# Altium PCB PCB1.PcbDoc
Units mm, origin at the board's own origin, x right, y up, seen from the top; angles counter-clockwise.
Board outline 113 x 67 mm, 2 copper layers (Top Layer, Bottom Layer); 67 components, 65 nets, 376 pads, 174 vias.
Unrouted connection lines stored in the file: 35.
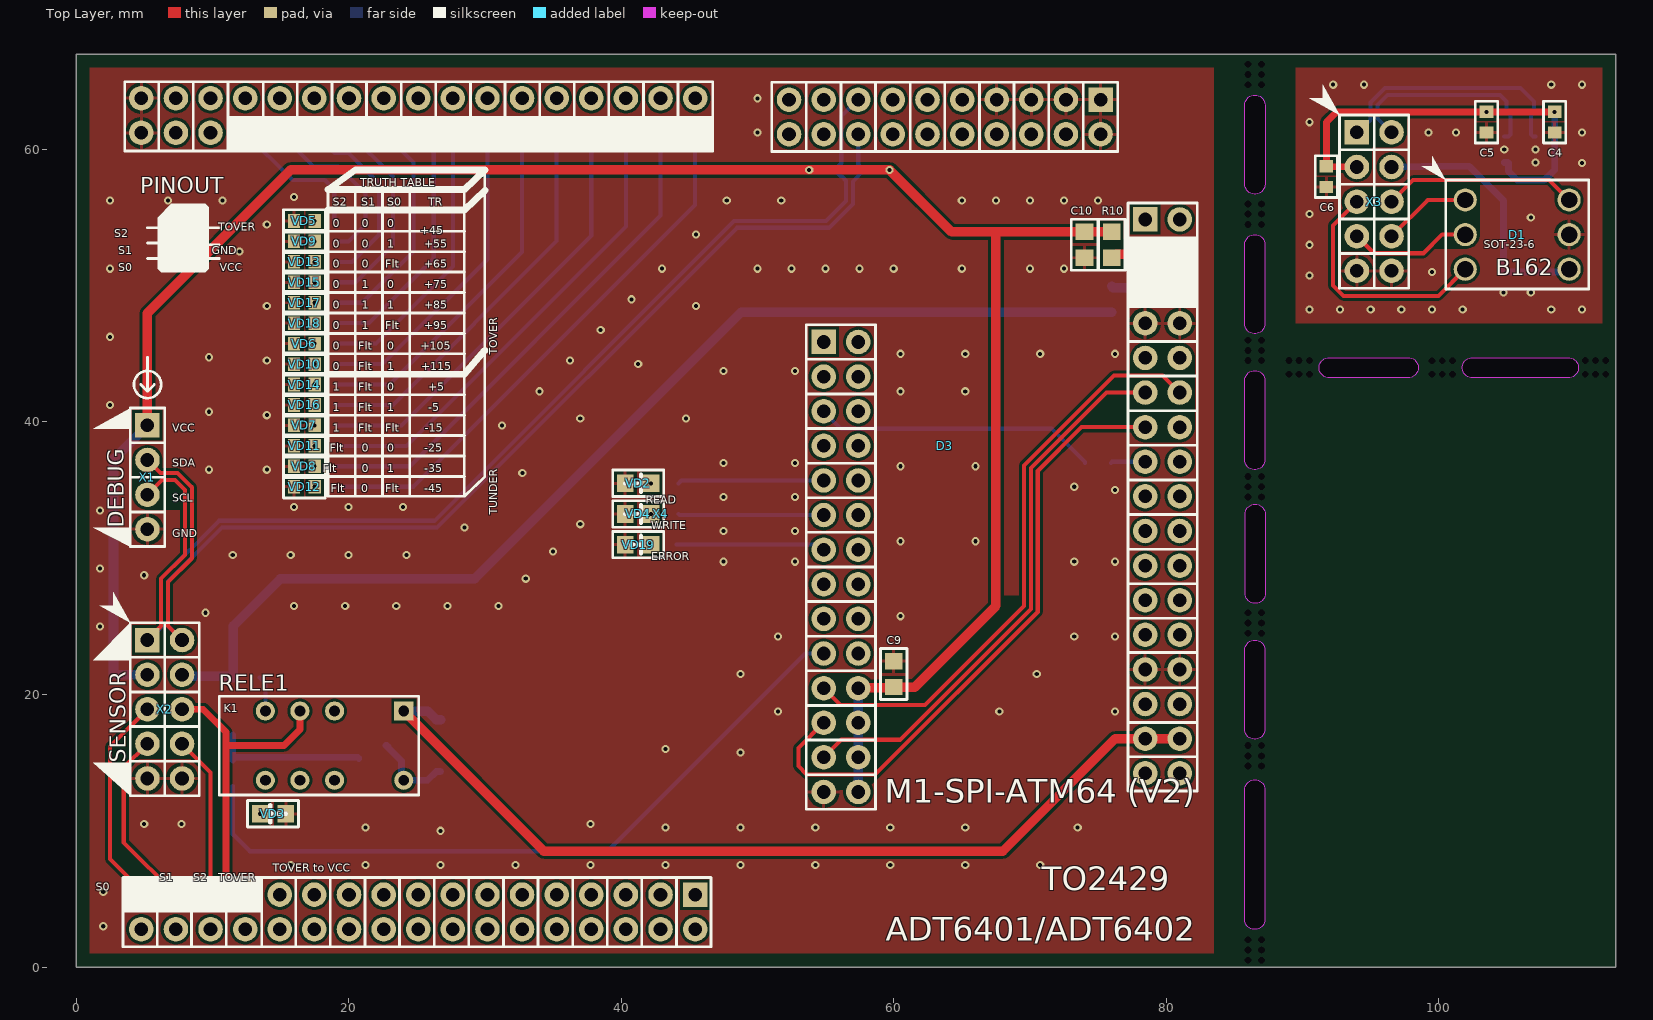
[diagram p0: Top Layer view]
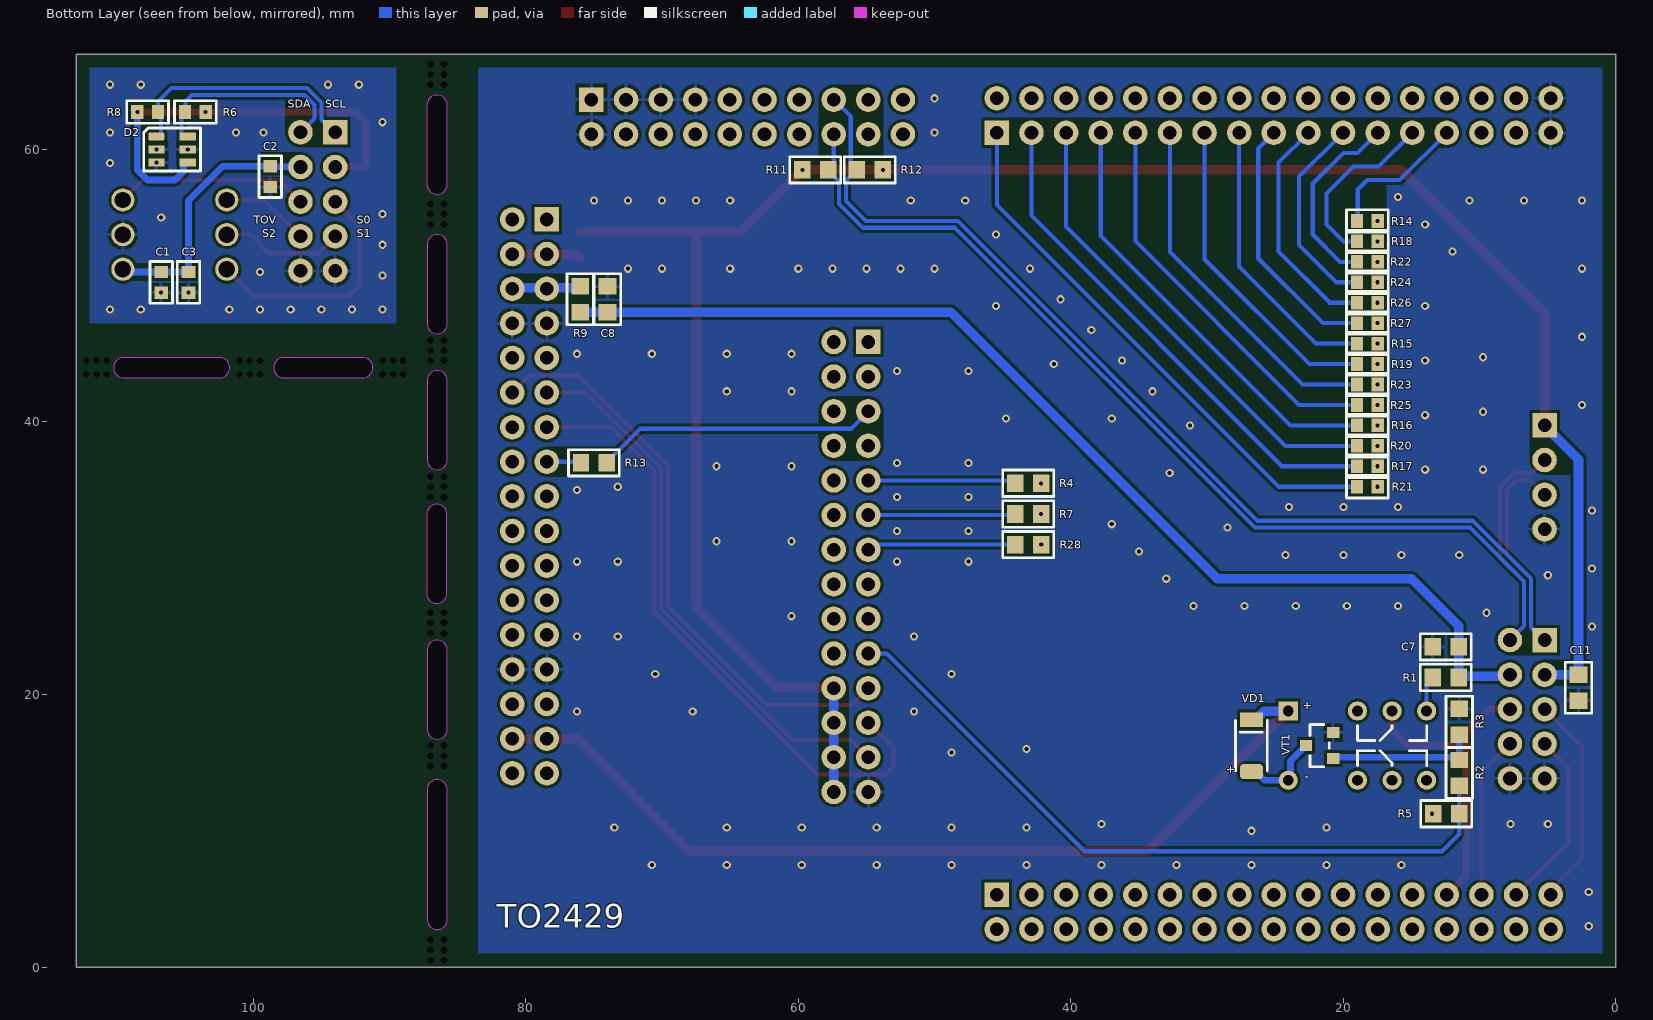
[diagram p1: Bottom Layer view, seen from below]

## Layer stack, top to bottom
Top Solder: solder mask 0.0102, Solder Resist, Dk 3.5
Top Layer: signal copper 0.0356
Dielectric 1: dielectric 0.32, FR-4, Dk 4.8
Bottom Layer: signal copper 0.0356
Bottom Solder: solder mask 0.0102, Solder Resist, Dk 3.5

## Board outline
0,0 113,0 113,67 0,67
cut-out: 87.242,3.5 cw(c86.5,3.5) 85.758,3.5 85.758,13 cw(c86.5,13) 87.242,13
cut-out: 102.459,43.247 cw(c102.459,43.989) 102.459,44.73 109.5,44.73 cw(c109.5,43.989) 109.5,43.247
cut-out: 91.959,43.247 cw(c91.959,43.989) 91.959,44.73 97.755,44.73 cw(c97.755,43.989) 97.755,43.247
cut-out: 87.242,17.462 cw(c86.5,17.462) 85.758,17.462 85.758,23.258 cw(c86.5,23.258) 87.242,23.258
cut-out: 87.266,27.43 cw(c86.524,27.43) 85.783,27.43 85.783,33.226 cw(c86.524,33.226) 87.266,33.226
cut-out: 87.242,37.238 cw(c86.5,37.238) 85.758,37.238 85.758,43.034 cw(c86.5,43.034) 87.242,43.034
cut-out: 87.242,47.212 cw(c86.5,47.212) 85.758,47.212 85.758,53.008 cw(c86.5,53.008) 87.242,53.008
cut-out: 87.25,57.454 cw(c86.508,57.454) 85.767,57.454 85.767,63.25 cw(c86.508,63.25) 87.25,63.25

## Design rules (kind name [scope] priority, off if disabled: settings)
Clearance [All] p1: gap=0.2 ignorepadtopadclearanceinfootprint=FALSE except(0: Arc-Hole Track-Hole SMDPad-Hole THPad-Hole Via-Hole Fill-Hole Poly-Hole Region-Hole Text-Hole)
ComponentClearance [All] p1: gap=0 collisioncheckmode=3 verticalgap=0 showdistances=FALSE
HoleToHoleClearance [All] p1: gap=0.2 allowstackedmicrovias=TRUE
MinimumSolderMaskSliver [All] p1: minsoldermaskwidth=0.1
PolygonConnect [All] p1: thpad.connectstyle=Relief thpad.reliefconductorwidth=0.254 thpad.reliefentries=4 thpad.polygonreliefangle="90 Angle" thpad.airgapwidth=0.254 smdpad.connectstyle=Relief smdpad.reliefconductorwidth=0.254 smdpad.reliefentries=4 smdpad.polygonreliefangle="90 Angle" smdpad.airgapwidth=0.254 via.connectstyle=Direct via.reliefconductorwidth=0.254 via.reliefentries=4 via.polygonreliefangle="90 Angle" via.airgapwidth=0.254
RoutingVias [All] p1: holewidth=0.3 width=0.6 viastyle="Through Hole" minholewidth=0.3 minwidth=0.6 maxholewidth=0.6 maxwidth=1.2
SilkToSilkClearance [All] p1: silktosilkclearance=0
SilkToSolderMaskClearance [IsPad] p1: minsilkscreentomaskgap=0 clearancetoexposedcopper=TRUE
SolderMaskExpansion [All] p1: expansion=0.102 istentingtop=FALSE
Width [All] p1: maxlimit=0.7 minlimit=0.3 preferedwidth=0.3
25 further rules are at their usual default settings.

## Classes and differential pairs
component class Main: C1 C2 C3 C4 C5 C6 C7 C8 C9 C10 C11 D1 D2 D3 K1 R1 R2 R3 R4 R5 R6 R7 R8 R9 R10 R11 R12 R13 R28 VD1 VD2 VD3 VD4 VD19 VT1 X1 X2 X3
component class FORMULA: R14 R15 R16 R17 R18 R19 R20 R21 R22 R23 R24 R25 R26 R27 VD5 VD6 VD7 VD8 VD9 VD10 VD11 VD12 VD13 VD14 VD15 VD16 VD17 VD18 X4

## Components (designator, comment, footprint, x,y, rotation, side; value= is the part's Value field where it differs from the comment)
C1 "0.1uF" 0603 106.75,50.25 r270 bottom
C2 "DNP" 0603 98.75,58 r270 bottom
C3 "DNP" 0603 104.75,50.25 r270 bottom
C4 "0.1uF" 0603 108.5,62 r270 top
C5 "DNP" 0603 103.5,62 r270 top
C6 "DNP" 0603 91.75,58 r270 top
C7 "0.1uF" 0805 12.5,23.5 r0 bottom
C8 "10uF" 0805 74,49 r90 bottom
C9 "0.1uF" 0805 60,21.5 r90 top
C10 "10uF" 0805 74,53 r270 top
C11 "0.1uF" 0805 2.75,20.5 r270 bottom
D1 "Temperature sensor ADT640X" "SOT-23-6 to DIP 7.62" 105.75,53.75 r0 top
D2 "I2C temperature sensor" SOT23-6 106,60 r270 bottom
D3 "M1-SPI-ATM64(V2)" M1-SPI-ATM64(V2) 63.75,38.25 r270 top locked
K1 "V23079A1001B301 TE" V23079A1001B301 17.75,16.25 r180 top locked
R1 "10k" 0805 12.5,21.25 r180 bottom
R2 "4.7k" 0805 11.5,14.25 r90 bottom
R3 "20k" 0805 11.5,18 r90 bottom
R4 "2.2k" 0805 43.12,35.5 r180 bottom
R5 "2.2k" 0805 12.45,11.25 r0 bottom
R6 "10k" 0603 104.25,62.75 r180 bottom
R7 "2.2k" 0805 43.12,33.25 r180 bottom
R8 "10k" 0603 107.75,62.75 r0 bottom
R9 "1" 0805 76,49 r90 bottom
R10 "1" 0805 76,53 r270 top
R11 "10k" 0805 58.75,58.5 r0 bottom
R12 "10k" 0805 54.75,58.5 r180 bottom
R13 "100" 0805 75,37 r0 bottom
R14 "1k" 0603 18.25,54.75 r180 bottom
R15 "1k" 0603 18.25,45.75 r180 bottom
R16 "1k" 0603 18.25,39.75 r180 bottom
R17 "1k" 0603 18.25,36.75 r180 bottom
R18 "1k" 0603 18.25,53.25 r180 bottom
R19 "1k" 0603 18.25,44.25 r180 bottom
R20 "1k" 0603 18.25,38.25 r180 bottom
R21 "1k" 0603 18.25,35.25 r180 bottom
R22 "1k" 0603 18.25,51.75 r180 bottom
R23 "1k" 0603 18.25,42.75 r180 bottom
R24 "1k" 0603 18.25,50.25 r180 bottom
R25 "1k" 0603 18.25,41.25 r180 bottom
R26 "1k" 0603 18.25,48.75 r180 bottom
R27 "1k" 0603 18.25,47.25 r180 bottom
R28 "2.2k" 0805 43.12,31 r180 bottom
VD1 "LL4148 NXP" SOD80C 26.75,16.25 r90 bottom
VD2 "LED(0805)" 0805(LED) 41.25,35.5 r180 top
VD3 "LED(0805)" 0805(LED) 14.45,11.25 r0 top
VD4 "LED(0805)" 0805(LED) 41.25,33.25 r180 top
VD5 "LED(0603)" 0603(LED) 16.75,54.75 r180 top
VD6 "LED(0603)" 0603(LED) 16.75,45.749 r180 top
VD7 "LED(0603)" 0603(LED) 16.75,39.749 r180 top
VD8 "LED(0603)" 0603(LED) 16.75,36.749 r180 top
VD9 "LED(0603)" 0603(LED) 16.75,53.25 r180 top
VD10 "LED(0603)" 0603(LED) 16.75,44.25 r180 top
VD11 "LED(0603)" 0603(LED) 16.75,38.249 r180 top
VD12 "LED(0603)" 0603(LED) 16.75,35.249 r180 top
VD13 "LED(0603)" 0603(LED) 16.75,51.75 r180 top
VD14 "LED(0603)" 0603(LED) 16.75,42.75 r180 top
VD15 "LED(0603)" 0603(LED) 16.75,50.25 r180 top
VD16 "LED(0603)" 0603(LED) 16.75,41.25 r180 top
VD17 "LED(0603)" 0603(LED) 16.75,48.75 r180 top
VD18 "LED(0603)" 0603(LED) 16.75,47.25 r180 top
VD19 "LED(0805)" 0805(LED) 41.25,31 r180 top
VT1 "MMBT5551L" SOT-23 21.75,16.25 r90 bottom
X1 "PLS4-2,54" PLS4-2,54 5.25,39.75 r270 top
X2 "PLD10-2,54" PLD10-2,54 5.25,24 r270 top
X3 "PLD10-2,54" PLD10-2,54 94,61.25 r270 top
X4 "FORMULA" FORMULA 33.25,32 r0 top locked

## Footprints (in the part's own frame and the unit in brackets; to place one, negate y for a bottom-side part, rotate by r counter-clockwise, add the part's x,y. Pads: shape width x height; smd on the part's side, far side on the other; paste and mask are expansions set on the pad)
0603 [mm]
  rect 0.9x1 smd: 1(-0.76,0) 2(0.76,0)
  silkscreen extent -1.53,-0.82 1.53,0.82, body extent -0.8,-0.4 0.8,0.4, height 0.45
0603(LED) [mm]
  rect 0.9x1 smd: 1(-0.76,0) 2(0.76,0)
  silkscreen extent -1.53,-0.82 1.53,0.82, body extent -0.82,-0.33 0.82,0.4, height 0.68
0805 [mm]
  rect 1.2x1.3 smd: 1(-0.95,0) 2(0.95,0)
  silkscreen extent -1.87,-0.97 1.87,0.97, body extent -1.05,-0.63 0.95,0.63, height 0.55
0805(LED) [mm]
  rect 1.2x1.3 smd: 1(-0.95,0) 2(0.95,0)
  silkscreen extent -1.87,-0.97 1.87,0.97, body extent -1.03,-0.41 1.03,0.5, height 0.85
FORMULA [mm]
  rect 1.8x1.8 hole 1: 1(12.18,29.22) VDDF(12.18,-26.68) VEEF(45.2,22.86)
  round 1.8 hole 1: 2(9.64,29.22) 3(7.1,29.22) 4(4.56,29.22) 5(2.02,29.22) 6(-0.52,29.22) 7(-3.06,29.22) 8(-5.6,29.22) 9(-8.14,29.22) 10(-10.68,29.22) 11(-13.22,29.22) 12(-15.76,29.22) 13(-18.3,29.22) 14(-20.84,29.22) 15(-23.38,29.22) 16(-25.92,29.22) 17(12.18,31.76) 18(9.64,31.76) 19(7.1,31.76) 20(4.56,31.76) 21(2.02,31.76) 22(-0.52,31.76) 23(-3.06,31.76) 24(-5.6,31.76) 25(-8.14,31.76) 26(-10.68,31.76) 27(-13.22,31.76) 28(-15.76,31.76) 29(-18.3,31.76) 30(-20.84,31.76) 31(-23.38,31.76) 32(-25.92,31.76) 33(-28.46,-29.22) 34(-25.92,-29.22) 35(-23.38,-29.22) 36(-20.84,-29.22) 37(-18.3,-29.22) 38(-15.76,-29.22) 39(-13.22,-29.22) 40(-10.68,-29.22) 41(-8.14,-29.22) 42(-5.6,-29.22) 43(-3.06,-29.22) 44(-0.52,-29.22) 45(2.02,-29.22) 46(4.56,-29.22) 47(7.1,-29.22) 48(9.64,-29.22) 49(-28.46,-26.68) 50(-25.92,-26.68) 51(-23.38,-26.68) 52(-20.84,-26.68) 53(-18.3,-26.68) 54(-15.76,-26.68) 55(-13.22,-26.68) 56(-10.68,-26.68) 57(-8.14,-26.68) 58(-5.6,-26.68) 59(-3.06,-26.68) 60(-0.52,-26.68) 61(2.02,-26.68) 62(4.56,-26.68) 63(7.1,-26.68) 64(9.64,-26.68) +5V(45.2,-15.24) +5V(47.74,-15.24) +5V_VCCF(45.2,20.32) +5V_VCCS(47.74,20.32) +5V_VDDF(45.2,17.78) +5V_VDDS(47.74,17.78) +12V(45.2,-12.7) +12V(47.74,-12.7) -12V(45.2,-17.78) -12V(47.74,-17.78) GND(-28.46,29.22) GND(-28.46,31.76) GND(45.2,-10.16) GND(45.2,15.24) GND(47.74,-10.16) GND(47.74,15.24) IN-OUT1(47.74,10.16) IN-OUT2(47.74,7.62) IN-OUT3(47.74,5.08) IN-OUT4(47.74,2.54) IN-OUT5(47.74,0) IN-OUT6(47.74,-2.54) IN-OUT7(47.74,-5.08) IN-OUT8(47.74,-7.62) NC(45.2,12.7) NC(47.74,12.7) OUT1(45.2,10.16) OUT2(45.2,7.62) OUT3(45.2,5.08) OUT4(45.2,2.54) OUT5(45.2,0) OUT6(45.2,-2.54) OUT7(45.2,-5.08) OUT8(45.2,-7.62) VDDS(12.18,-29.22) VEES(47.74,22.86)
  silkscreen extent -29.8,-30.51 49.02,32.97, body extent -29.79,-30.4 48.98,32.92, height 3
M1-SPI-ATM64(V2) [mm]
  rect 1.8x1.8 hole 1: 1X2(-25.4,11.43) 1X3(-7.62,-8.89)
  round 1.8 hole 1: 2X2(-22.86,11.43) 2X3(-7.62,-6.35) 3X2(-25.4,8.89) 3X3(-5.08,-8.89) 4X2(-22.86,8.89) 4X3(-5.08,-6.35) 5X2(-25.4,6.35) 5X3(-2.54,-8.89) 6X2(-22.86,6.35) 6X3(-2.54,-6.35) 7X2(-25.4,3.81) 7X3(0,-8.89) 8X2(-22.86,3.81) 8X3(0,-6.35) 9X2(-25.4,1.27) 9X3(2.54,-8.89) 10X2(-22.86,1.27) 10X3(2.54,-6.35) 11X2(-25.4,-1.27) 11X3(5.08,-8.89) 12X2(-22.86,-1.27) 12X3(5.08,-6.35) 13X2(-25.4,-3.81) 13X3(7.62,-8.89) 14X2(-22.86,-3.81) 14X3(7.62,-6.35) 15X2(-25.4,-6.35) 15X3(10.16,-8.89) 16X2(-22.86,-6.35) 16X3(10.16,-6.35) 17X2(-25.4,-8.89) 17X3(12.7,-8.89) 18X2(-22.86,-8.89) 18X3(12.7,-6.35) 19X2(-25.4,-11.43) 19X3(15.24,-8.89) 20X2(-22.86,-11.43) 20X3(15.24,-6.35) 21X3(17.78,-8.89) 22X3(17.78,-6.35) 23X3(20.32,-8.89) 24X3(20.32,-6.35) 25X3(22.86,-8.89) 26X3(22.86,-6.35) 27X3(25.4,-8.89) 28X3(25.4,-6.35)
  silkscreen extent -26.67,-12.7 26.67,12.7
PLD10-2,54 [mm]
  rect 1.8x1.8 hole 1: 1(0,-0.01)
  round 1.8 hole 1: 2(0,2.53) 3(2.54,-0.01) 4(2.54,2.53) 5(5.08,-0.01) 6(5.08,2.53) 7(7.62,-0.01) 8(7.62,2.53) 9(10.16,-0.01) 10(10.16,2.53)
  silkscreen extent -1.27,-1.28 11.43,3.8, body extent -1.27,-1.28 11.43,3.8, height 8.54
PLS4-2,54 [mm]
  rect 1.8x1.8 hole 1: 1(0,-0.01)
  round 1.8 hole 1: 2(2.54,-0.01) 3(5.08,-0.01) 4(7.62,-0.01)
  silkscreen extent -1.27,-1.28 8.89,1.26, body extent -1.27,-1.28 8.89,1.26, height 9.2
SOD80C [mm]
  rrect50% 1.1x1.7 smd: 1(-1.9,0)
  rect 1.1x1.7 smd: 2(1.9,0)
  silkscreen extent -1.85,-1.17 1.85,1.17, body extent -1.9,-0.8 1.8,0.8, height 1.55
SOT23-6 [mm]
  rrect50% 0.6x1.2 smd: 1(-0.95,-1.1)
  rect 0.6x1.2 smd: 2(0,-1.1) 3(0.95,-1.1) 4(0.95,1.2) 5(0,1.2) 6(-0.95,1.2)
  silkscreen extent -1.57,-2.03 1.58,2.13
SOT-23 [mm]
  rect 0.8x0.9 smd: 1(-0.95,-1) 1(-0.95,-1) 2(0.95,-1) 2(0.95,-1) 3(0,1) 3(0,1)
  silkscreen extent -1.55,-0.72 1.55,0.7, body extent -1.5,-1.25 1.5,1.25, height 1.05
"SOT-23-6 to DIP 7.62" [mm]
  round 1.7 hole 1.2: 1(-3.81,2.54) 2(-3.81,0) 3(-3.81,-2.54) 4(3.81,-2.54) 5(3.81,0) 6(3.81,2.54)
  silkscreen extent -7,-4 5.25,5.75, body extent -5.05,-3.81 5.05,3.81, height 3.05
V23079A1001B301 [mm]
  rect 1.4x1.4 hole 0.8: 1(-6.3,-2.54)
  round 1.4 hole 0.8: 3(-1.22,-2.54) 4(1.32,-2.54) 5(3.86,-2.54) 8(3.86,2.54) 9(1.32,2.54) 10(-1.22,2.54) 12(-6.3,2.54)
  silkscreen extent -7.4,-3.63 7.25,3.63, body extent -7.25,-3.6 7.25,3.6, height 9.4

## Part data
C1 C2 C3 C4 C5 C6: library part C0603, ComponentHeigt=1.3, Firme=AVX, KIND=Конденсатор, Leadform=SMD, Packaging=0805
C7 C8 C9 C10 C11: library part C0805, ComponentHeigt=1.3, Firme=AVX, KIND=Конденсатор, Leadform=SMD, Packaging=0805
D1: library part ADT6402
D2: library part TMP100
R1 R2 R3 R4 R5 R7 R9 R10 R11 R12 R13 R28: library part "R0805 Yageo", ComponentHeigt=0.6, Firme=Yageo, KIND=Резистор, Leadform=SMD, Packaging=0805
R6 R8 R14 R15 R16 R17 R18 R19 R20 R21 R22 R23 R24 R25 R26 R27: library part "R0603 Yageo", ComponentHeigt=0.5, Firme=Yageo, KIND=Резистор, Leadform=SMD, Packaging=0402
D3 X1 X2 X3: ComponentHeigt=5.5, Name=Вилка, Specification="Вилка PLD2-2 *", Typ=PLD2-2
VD1: Component Link=http://www.nxp.com, ComponentHeigt=1.6, Firme=NXP, KIND="Диод LL4148 NXP", Leadform=SMD, NN=24009301, Packaging=SOD-80C
VD2 VD3 VD4 VD5 VD6 VD7 VD8 VD9 VD10 VD11 VD12 VD13 VD14 VD15 VD16 VD17 VD18 VD19: ComponentHeigt=0.75, Firme=Kingbright, KIND="Светодиод L-1154GD Kingbright", Leadform="в отверстия", NN=24003000
VT1: ComponentHeigt=1.1, Firme=ONS, KIND="Транзистор MMBT5551L*G ONS", Leadform=SMD, NN=24007468, Packaging=SOT-23

## Free pads (board coordinates)
  round 0 hole 0.5 unplated: 38(87,1.25) 38(87,15.5) 38(87,25.25) 38(87,35.25) 38(87,45.25) 38(87,55.25) 38(87,65.5) 38(89.75,43.5) 38(100.255,43.497) 38(111.5,43.5) 39(87,2) 39(87,16.25) 39(87,26) 39(87,36) 39(87,46) 39(87,56) 39(87,66.25) 39(90.5,43.5) 39(101.005,43.497) 39(112.25,43.5) 41(86,15.5) 41(86,0.5) 41(86,1.25) 41(86,14.75) 41(86,24.5) 41(86,25.25) 41(86,34.5) 41(86,35.25) 41(86,44.5) 41(86,45.25) 41(86,54.5) 41(86,55.25) 41(86,64.75) 41(86,65.5) 41(89,44.5) 41(89.75,44.5) 41(99.505,44.497) 41(100.255,44.497) 41(110.75,44.5) 41(111.5,44.5) 42(86,2) 42(86,16.25) 42(86,26) 42(86,36) 42(86,46) 42(86,56) 42(86,66.25) 42(90.5,44.5) 42(101.005,44.497) 42(112.25,44.5) 43(87,0.5) 43(87,14.75) 43(87,24.5) 43(87,34.5) 43(87,44.5) 43(87,54.5) 43(87,64.75) 43(89,43.5) 43(99.505,43.497) 43(110.75,43.5)

## Via types
v1: diameter 0.6, hole 0.3, Top Layer to Bottom Layer, tented both sides, 174 vias

## Nets (pads, with @x,y where several pads share a name; then routed paths per layer and width w, separated by ;. In a path a pad name is that pad's centre, name@x,y a point inside that pad or via, vN(x,y) a via of type N, cw(c..) or ccw(c..) an arc to the next point about the centre after c; other vN are vias at no path point)
1: R14.1 X4.14 | length 10.6
  Bottom Layer w0.3: X4.14 15.88,57.75 18.25,57.75 18.947,57.053 18.947,54.813 R14.1
2: R18.1 X4.13 | length 13.2
  Bottom Layer w0.3: X4.13 17.42,58.75 19.25,58.75 21.25,56.75 21.25,54.5 20,53.25 R18.1
3: R22.1 X4.12 | length 14.1
  Bottom Layer w0.3: X4.12 18.96,59.75 20,59.75 22.25,57.5 22.25,53.75 20.25,51.75 R22.1
4: R24.1 X4.11 | length 14.9
  Bottom Layer w0.3: R24.1 20.5,50.25 23.25,53 23.25,58 X4.11
5: R26.1 X4.10 | length 16.9
  Bottom Layer w0.3: R26.1 21,48.75 24.75,52.5 24.75,59.04 X4.10
6: R27.1 X4.9 | length 18.9
  Bottom Layer w0.3: R27.1 21.5,47.25 26.25,52 26.25,60.08 X4.9
7: R15.1 X4.8 | length 20.8
  Bottom Layer w0.3: R15.1 22,45.75 27.65,51.4 X4.8
8: R19.1 X4.7 | length 23.6
  Bottom Layer w0.3: R19.1 22.5,44.25 30.19,51.94 X4.7
9: R23.1 X4.6 | length 26.5
  Bottom Layer w0.3: R23.1 23,42.75 32.73,52.48 X4.6
10: R25.1 X4.5 | length 29.2
  Bottom Layer w0.3: R25.1 23.25,41.25 35.27,53.27 X4.5
11: R16.1 X4.4 | length 32.1
  Bottom Layer w0.3: R16.1 23.879,39.75 37.81,53.681 X4.4
12: R20.1 X4.3 | length 34.9
  Bottom Layer w0.3: R20.1 24.25,38.25 40.35,54.35 X4.3
13: R17.1 X4.2 | length 37.6
  Bottom Layer w0.3: R17.1 24.5,36.75 42.89,55.14 X4.2
14: R21.1 X4.1 | length 40.3
  Bottom Layer w0.3: R21.1 24.75,35.25 45.43,55.93 X4.1
+5V: K1.1 VD1.2 X4.+5V | length 67.6
  Top Layer w0.7: K1.1 34.34,8.5 68,8.5 76.26,16.76 78.45,16.76 X4.+5V@80.99,16.76
  Bottom Layer w0.7: K1.1 25.81,18.79 26.45,18.15 VD1.2
DI1_MC: D3.21X3 X4.IN-OUT1 | length 43.2
  Top Layer w0.3: D3.21X3 56.11,19.22 62.306,19.22 69.571,26.485 69.571,36.821 76.16,43.41 79.74,43.41 X4.IN-OUT1
DO1_MC: D3.25X3 X4.OUT1 | length 40.7
  Top Layer w0.3: D3.25X3 56.15,16.68 60.473,16.68 70.071,26.278 70.071,36.614 75.617,42.16 X4.OUT1
DO2_MC: D3.23X3 X4.OUT2 | length 46.3
  Top Layer w0.3: D3.23X3 53,16.07 53,14.75 53.61,14.14 58.64,14.14 70.571,26.071 70.571,36.407 73.784,39.62 X4.OUT2
GND: C7.2 C8.2 C9.2 C10.2 C11.2 D3.1X2 D3.2X2 D3.3X2 D3.5X2 D3.7X2 D3.27X3 R3.2 VD2.2 VD3.2 VD4.2 VD5.2 VD6.2 VD7.2 VD8.2 VD9.2 VD10.2 VD11.2 VD12.2 VD13.2 VD14.2 VD15.2 VD16.2 VD17.2 VD18.2 VD19.2 VT1.2 X1.4 X2.9 X2.10 X4.GND
  other v1: 2,3 2,5.5 15.75,7.5 21.25,7.5 26.75,7.5 32.25,7.5 37.75,7.5 43.25,7.5 48.75,7.5 54.25,7.5 59.75,7.5 65.25,7.5 70.75,7.5 26.75,10 21.25,10.25 43.25,10.25 48.75,10.25 54.25,10.25 59.75,10.25 65.25,10.25 73.5,10.25 5,10.5 7.75,10.5 37.75,10.5 48.75,15.75 43.25,16 51.5,18.75 67.75,18.75 76.25,18.75 48.75,21.5 70.5,21.5 51.5,24.25 73.25,24.25 76.25,24.25 1.75,25 60.5,25.75 9.5,26 16,26.5 19.75,26.5 23.5,26.5 27.25,26.5 31,26.5 33,28.5 5,28.75 1.75,29.25 47.5,29.75 52.75,29.75 73.25,29.75 76.25,29.75 11.5,30.25 15.75,30.25 20,30.25 24.25,30.25 35,30.5 60.5,31.25 66,31.25 47.5,32 52.75,32 28.5,32.25 37,32.5 1.75,33.5 16,33.75 20,33.75 24,33.75 47.5,34.5 52.75,34.5 76.25,35 73.25,35.25 32.75,36.25 9.75,36.5 14,36.5 60.5,36.75 66,36.75 47.5,37 52.75,37 31.25,39.75 37,40.25 44.75,40.25 14,40.5 9.75,40.75 2.5,41.25 34,42.25 60.5,42.25 65.25,42.25 47.5,43.75 52.75,43.75 41.25,44.25 14,44.5 36.25,44.5 9.75,44.75 60.5,45 65.25,45 70.75,45 76.25,45 2.5,46.25 38.5,46.75 14,48.5 45.5,48.5 40.75,49 2.5,51.25 43,51.25 50,51.25 52.5,51.25 55,51.25 57.5,51.25 60,51.25 65,51.25 70,51.25 72.5,51.25 12,52.5 45.5,53.75 14,54.5 2.5,56.25 6.75,56.25 10.75,56.25 47.75,56.25 51.75,56.25 65,56.25 67.5,56.25 70,56.25 72.5,56.25 75,56.25 16,56.5 50,61.25 50,63.75
GND_KY: C1.2 C2.2 C3.2 C4.2 C5.2 C6.2 D1.5 D2.2 D2.3 D2.5 X3.9 X3.10
  other v1: 90.5,48.25 92.75,48.25 95,48.25 97.25,48.25 99.5,48.25 101.75,48.25 108.25,48.25 110.5,48.25 104.75,49.49 106.75,49.49 90.5,50.75 99.5,51 90.5,53 106.75,55 90.5,55.25 110.5,59 107.1,59.05 104.8,60 107.1,60 99.25,61.25 101.25,61.25 110.5,61.25 90.5,62 92.25,64.75 94.5,64.75 108.25,64.75 110.5,64.75
IN1: K1.4 X2.6 X4.52 | length 23.7
  Top Layer w0.5: X2.6 9.33,18.92 11,17.25 11,16.25 ; X4.52 11,6.73 11,16.25 ; K1.4 16.43,17.43 15.25,16.25 11,16.25
LED_ERROR: D3.13X3 R28.1 | length 11.2
  Bottom Layer w0.3: R28.1 54.86,31 D3.13X3
LED_READ: D3.9X3 R4.1 | length 10.7
  Bottom Layer w0.3: R4.1@44.2,35.5 44.41,35.71 D3.9X3
LED_WRITE: D3.11X3 R7.1 | length 10.7
  Bottom Layer w0.3: R7.1@44.2,33.25 44.28,33.17 D3.11X3
NetK1_5: K1.5 R1.1 | length 2.6
  Bottom Layer w0.3: R1.1 13.89,20.81 K1.5
NetK1_12: K1.12 VD1.1 VT1.3 | length 6.1
  Bottom Layer w0.5: VT1.3@22.75,16.25 22.8,16.25 22.95,16.1 22.95,16.05 23.878,15.122 23.878,13.882 K1.12 25.796,13.71 26.436,14.35 VD1.1
NetR2_2: R2.2 R3.1 VT1.1 | length 11.2
  Bottom Layer w0.5: R3.1 11.5,15.399 R2.2 11.699,15.399 20.651,15.399 VT1.1@20.75,15.3
NetR4_2: R4.2 VD2.1
  other v1: 42.2,35.5
NetR5_2: R5.2 VD3.1
  other v1: 13.5,11.25
NetR7_2: R7.2 VD4.1
  other v1: 42.2,33.25
NetR14_2: R14.2 VD5.1
  other v1: 17.5,54.75
NetR15_2: R15.2 VD6.1
  other v1: 17.5,45.75
NetR16_2: R16.2 VD7.1
  other v1: 17.5,39.75
NetR17_2: R17.2 VD8.1
  other v1: 17.5,36.75
NetR18_2: R18.2 VD9.1
  other v1: 17.5,53.25
NetR19_2: R19.2 VD10.1
  other v1: 17.5,44.25
NetR20_2: R20.2 VD11.1
  other v1: 17.5,38.25
NetR21_2: R21.2 VD12.1
  other v1: 17.5,35.25
NetR22_2: R22.2 VD13.1
  other v1: 17.5,51.75
NetR23_2: R23.2 VD14.1
  other v1: 17.5,42.75
NetR24_2: R24.2 VD15.1
  other v1: 17.5,50.25
NetR25_2: R25.2 VD16.1
  other v1: 17.5,41.25
NetR26_2: R26.2 VD17.1
  other v1: 17.5,48.75
NetR27_2: R27.2 VD18.1
  other v1: 17.5,47.25
NetR28_2: R28.2 VD19.1
  other v1: 42.17,31
OUT1: X2.5 X4.49 | length 15.7
  Top Layer w0.3: X4.49 4.79,5.629 2.5,7.919 2.5,16.18 X2.5
OUT2: X2.7 X4.50 | length 13.4
  Top Layer w0.3: X2.7 3.5,14.64 3.5,9.15 X4.50
OUT3: X2.8 X4.51 | length 11.9
  Top Layer w0.3: X2.8 9.87,14.29 X4.51
RELE1: D3.19X3 R2.1 R5.1 | length 53.4
  Bottom Layer w0.3: R2.1 R5.1 11.5,9.75 12.75,8.5 39,8.5 53.51,23.01 D3.19X3
RST_IN: R13.2 X4.OUT3 | length 2.5
  Bottom Layer w0.3: R13.2 76.03,37.08 X4.OUT3
RST_MC: D3.5X3 R13.1 | length 20.8
  Bottom Layer w0.3: D3.5X3 56.15,39.5 71.6,39.5 74.05,37.05 R13.1
S0: D1.3 X3.5 | length 17.7
  Top Layer w0.3: X3.5 92.25,54.43 92.25,50 93,49.25 99.98,49.25 D1.3
S1: D1.2 X3.7 | length 9
  Top Layer w0.3: X3.7 95.24,52.38 98.88,52.38 100.25,53.75 D1.2
S2: D1.1 X3.8 | length 6.5
  Top Layer w0.3: X3.8 99.19,56.29 D1.1
SCL_TMP100: D2.1 R8.1 X3.1 | length 18.4
  Bottom Layer w0.3: X3.1 94.74,62 94.824,62 95,62.176 95,63.457 96.043,64.5 106,64.5 106.976,63.524 106.976,62.764 R8.1 106.75,62.51 106.75,61.1 106.9,60.95 D2.1
SCL_W: D3.15X2 R12.1 X1.3 X2.1 | length 90.9
  Top Layer w0.3: X2.1 6.25,25.01 6.25,28.5 8,30.25 8,35 7.25,35.75 6.321,35.75 X1.3
  Bottom Layer w0.3: X2.1 5.99,24.75 6.074,24.75 6.25,24.926 6.25,28.5 10.5,32.75 26.293,32.75 48.293,54.75 55.043,54.75 56.5,56.207 56.5,57.7 56.2,58 56.15,58 55.7,58.45 R12.1 56.15,58.95 56.15,62.4 D3.15X2
SDA_TMP100: D2.6 R6.1 X3.2 | length 15.5
  Bottom Layer w0.3: X3.2 95.5,62.28 95.5,63.25 96.25,64 104.5,64 104.976,63.524 104.976,62.784 105.25,62.51 105.25,61.1 105.1,60.95 D2.6
SDA_W: D3.16X2 R11.1 X1.2 X2.2 | length 88.5
  Top Layer w0.3: X1.2 6.2,36.25 7.457,36.25 8.5,35.207 8.5,30 6.75,28.25 6.75,25.03 X2.2
  Bottom Layer w0.3: X2.2 6.75,25.03 6.75,28.293 10.707,32.25 26.5,32.25 48.5,54.25 55.25,54.25 57,56 57,57.65 57.8,58.45 R11.1 57.4,58.9 D3.16X2
TOVER: D1.6 X3.6 | length 14.3
  Top Layer w0.3: X3.6 98.11,57.75 108.1,57.75 D1.6
VCC: R10.2 X4.+5V_VCCF X4.+5V_VCCS | length 5.1
  Top Layer w0.7: R10.2 76.05,52.05 76.32,52.32 X4.+5V_VCCF X4.+5V_VCCS
VCC_KY: C4.1 C5.1 C6.1 D2.4 R6.2 R8.2 X3.3 | length 31.7
  Top Layer w0.5: X3.3 93.965,58.735 91.775,58.735 C6.1 91.75,62 92.5,62.75 103.49,62.75 C4.1@108.51,62.75 ; v1(103.51,62.75) C5.1@103.52,62.76
  Bottom Layer w0.5: D2.4 105.055,59.05 105.105,59 105.105,58.395 105.75,57.75 107.75,57.75 108.51,58.51 R8.2@108.51,62.7
  other v1: 108.49,62.75
VCC_W: C9.1 C10.1 C11.1 D3.22X3 D3.24X3 D3.26X3 D3.28X3 R10.1 R11.2 R12.2 X1.1 X2.3 | length 154.7
  Top Layer w0.7: X1.1 5.24,47.99 15.75,58.5 v1(53.8,58.5) v1(59.7,58.5) 64.25,53.95 67.5,53.95 ; D3.22X3@57.41,20.46 D3.22X3 57.44,20.51 59.96,20.51 C9.1 61.55,20.55 67.5,26.5 67.5,53.95 ; R10.1 C10.1 67.5,53.95
  Bottom Layer w0.7: X2.3 5.235,21.455 2.755,21.455 C11.1 2.75,37.26 X1.1 ; D3.28X3 D3.26X3 D3.24X3 D3.22X3
VDD: R9.2 X4.+5V_VDDF X4.+5V_VDDS | length 5.1
  Bottom Layer w0.7: R9.2 76.085,49.865 80.905,49.865 X4.+5V_VDDS
VDD_ADT640X: C1.1 C2.1 C3.1 D1.4 X3.4 | length 19.4
  Bottom Layer w0.5: X3.4 96.555,58.735 98.725,58.735 C2.1 102.24,58.76 104.75,56.25 C3.1 109.36,51.01 D1.4
VDD_W: C7.1 C8.1 R1.2 R9.1 X2.4 | length 81.6
  Bottom Layer w0.7: X2.4 7.885,21.355 11.445,21.355 R1.2 C7.1 11.55,25.05 15,28.5 29.25,28.5 48.8,48.05 C8.1 R9.1
pads on no net: D3.1X3 D3.2X3 D3.3X3 D3.4X2 D3.4X3 D3.6X2 D3.6X3 D3.7X3 D3.8X2 D3.8X3 D3.9X2 D3.10X2 D3.10X3 D3.11X2 D3.12X2 D3.12X3 D3.13X2 D3.14X2 D3.14X3 D3.15X3 D3.16X3 D3.17X2 D3.17X3 D3.18X2 D3.18X3 D3.19X2 D3.20X2 D3.20X3 K1.3 K1.8 K1.9 K1.10 X4.15 X4.16 X4.17 X4.18 X4.19 X4.20 X4.21 X4.22 X4.23 X4.24 X4.25 X4.26 X4.27 X4.28 X4.29 X4.30 X4.31 X4.32 X4.33 X4.34 X4.35 X4.36 X4.37 X4.38 X4.39 X4.40 X4.41 X4.42 X4.43 X4.44 X4.45 X4.46 X4.47 X4.48 X4.53 X4.54 X4.55 X4.56 X4.57 X4.58 X4.59 X4.60 X4.61 X4.62 X4.63 X4.64 X4.+12V X4.-12V X4.IN-OUT2 X4.IN-OUT3 X4.IN-OUT4 X4.IN-OUT5 X4.IN-OUT6 X4.IN-OUT7 X4.IN-OUT8 X4.NC X4.OUT4 X4.OUT5 X4.OUT6 X4.OUT7 X4.OUT8 X4.VDDF X4.VDDS X4.VEEF X4.VEES

## Polygon pours and split planes (outlines as drawn)
GND_KY on Top Layer "NONET_L-01_P-001" (solid, remove dead copper, pour order 2): 89.5,66 89.5,47.25 112,47.25 112,66
GND on Top Layer "NONET_L-01_P-001" (solid, remove dead copper, pour order 0): 1,66 1,1 83.5,1 83.5,66
GND_KY on Bottom Layer "NONET_L-01_P-001" (solid, remove dead copper, pour order 3): 89.5,66 89.5,47.25 112,47.25 112,66
GND on Bottom Layer "NONET_L-01_P-001" (solid, remove dead copper, pour order 1): 83.5,66 83.5,1 1,1 1,66

## Other copper
Top Layer:
  pour cut-out: 109.422,57.34 108.83,57.34 108.83,57.02
  pour cut-out: 108.51,56.428 108.51,57.02 108.83,57.02
  pour cut-out: 101.802,50.16 101,50.16 101,50.5
  pour cut-out: 94.988,52.128 95.5,52.128 95.5,51.5
  pour cut-out: 94.135,52.53 95,52.53 95,53
  pour cut-out: 12.265,6.42 11.5,6.42 11.5,6
  pour cut-out: 7.185,6.42 6,6.42 6,5.75
  pour cut-out: 7.925,25.1 6.5,25.1 6.5,24.5
  pour cut-out: 6.34,37.065 6.34,36.25 6.2,36.25
  pour cut-out: 4.14,18.775 4.14,18.25 4.5,18.25
  pour cut-out: 5.385,15.28 4,15.28 4,16.25
  pour cut-out: 7.78,15.28 9.5,15.28 9.5,16
  pour cut-out: 5.385,15.28 7.78,15.28 7.78,16.38
  pour cut-out: 5.385,20.02 7.78,20.02 7.78,18.92
  pour cut-out: 80.845,15.66 78.45,15.66 78.45,16.76
  pour cut-out: 78.595,17.86 80.99,17.86 80.99,16.76
  pour cut-out: 53.76,18.075 53.76,16.5 54.25,16.5
  pour cut-out: 78.45,53.42 76.25,53.42 76.25,52.5
  pour cut-out: 58.892,13.888 57.75,13.888 57.75,12.75
  pour cut-out: 67.5,27.25 69.571,27.25 69.571,26.485
  pour cut-out: 97.63,61.395 97.63,62.75 96.75,62.75
  pour cut-out: 96.675,60.15 93.99,60.15 93.99,61.25
  pour cut-out: 95.09,58.855 95.09,61.25 93.99,61.25
  pour cut-out: 96.53,57.27 98,57.27 98,57
  pour cut-out: 101.802,52.7 99.565,52.7 99.565,53.065
  pour cut-out: 102.99,56.428 102.99,53.75 101.94,53.75
  pour cut-out: 102.99,56.428 102.99,57.5 102.25,57.5
  pour cut-out: 97.684,51.242 97.684,52.5 97,52.5
  pour cut-out: 95.376,51.242 95.376,52.5 96,52.5
  pour cut-out: 94.135,52.53 92.25,52.53 92.25,53.75
  pour cut-out: 93.845,57.27 96.53,57.27 96.53,56.17
  pour cut-out: 95.43,56.025 95.43,53.63 96.53,53.63
  pour cut-out: 5.385,33.57 8,33.57 8,35
  pour cut-out: 4.14,37.065 4.14,34.67 5.24,34.67
  pour cut-out: 73.15,53.15 76.85,53.15 76.85,54.75
  pour cut-out: 76.85,54.75 73.15,54.75 73.15,53.15
  pour cut-out: 80.845,53.42 78.45,53.42 78.45,52.32
  pour cut-out: 78.595,51.22 80.99,51.22 80.99,52.32
  pour cut-out: 76.622,51.25 78.45,51.25 78.45,52.473
  pour cut-out: 75.15,54.75 75.15,51.25 76.85,51.25 76.85,54.75
  pour cut-out: 80.845,38.52 78.45,38.52 78.45,39.62
  pour cut-out: 82.09,42.16 82.09,39.62 80.99,39.62
  pour cut-out: 82.09,44.555 82.09,42.16 80.99,42.16
  pour cut-out: 78.595,45.8 80.99,45.8 80.99,44.7
  pour cut-out: 77.35,44.845 77.35,42.16 78.45,42.16
  pour cut-out: 55.005,21.57 57.42,21.57 57.42,20.49
  pour cut-out: 53.706,13.002 53.706,15.39 54.86,15.39
  pour cut-out: 55.887,13.002 57.4,13.002 57.4,15.609
  pour cut-out: 53.76,20.325 53.76,17.93 54.86,17.93
  pour cut-out: 6.68,19.065 6.68,16.38 7.78,16.38
  pour cut-out: 10.015,4.22 12.5,4.22 12.5,5
  pour cut-out: 4.935,4.22 7.33,4.22 7.33,5.32
  pour cut-out: 6.34,19.065 6.34,16.38 5.24,16.38
  pour cut-out: 5.871,22.9 7.78,22.9 7.78,24.358
Bottom Layer:
  pour cut-out: 102.84,62.05 102.84,64 103.25,64
  pour cut-out: 78.595,50.88 75.15,50.88 75.15,49.15
  pour cut-out: 12.265,60.12 14.95,60.12 14.95,61.22
  pour cut-out: 41.37,31.85 41.37,30.15 44.87,30.15 44.87,31.85
  pour cut-out: 16.84,55.45 16.84,57.5 18.25,57.5
  pour cut-out: 16.84,55.45 16.84,34.55 19.5,34.55 19.5,55.75
  pour cut-out: 12.555,62.32 45.43,62.32 45.43,61.22
  pour cut-out: 109.16,63.45 106.393,63.45 106.393,62.05 109.16,62.05
  pour cut-out: 104.893,62.05 106.99,62.05 106.99,62.75
  pour cut-out: 103,62.25 103,64 104.5,64
  pour cut-out: 105.66,62.05 105.66,63.45 102.84,63.45 102.84,62.05
  pour cut-out: 107.45,51.66 109.56,51.66 109.56,50.36
  pour cut-out: 107.116,50.36 109.56,50.36 109.56,51.344
  pour cut-out: 104.05,51.66 104.05,50.36 107.45,50.36 107.45,51.66
  pour cut-out: 99.45,58.11 96.385,58.11 96.385,59.81
  pour cut-out: 96.385,59.81 99.45,59.81 99.45,58.11
  pour cut-out: 97.63,61.395 97.63,64 96.25,64
  pour cut-out: 92.89,60.15 96.53,60.15 96.53,61.25
  pour cut-out: 58.5,12.995 58.5,20.47 57.4,20.47
  pour cut-out: 56.3,20.325 56.3,12.85 57.4,12.85
  pour cut-out: 5.385,36.11 2.75,36.11 2.75,37.26
  pour cut-out: 6.34,40.85 6.34,37.21 5.24,37.21
  pour cut-out: 5.385,22.56 5.385,20.65 1.9,20.65
  pour cut-out: 5.385,22.56 1.9,22.56 1.9,20.65
  pour cut-out: 10.75,20.4 14.25,20.4 14.25,22.1
  pour cut-out: 14.25,22.1 10.75,22.1 10.75,20.4
  pour cut-out: 12.35,20.4 12.35,24.35 10.75,24.35 10.75,20.4
  pour cut-out: 4.14,22.9 7.78,22.9 7.78,24
  pour cut-out: 14.2,12.1 10.65,12.1 10.65,10.4 14.2,10.4
  pour cut-out: 10.65,17.85 10.65,10.4 12.35,10.4 12.35,17.85
  pour cut-out: 41.5,34.1 41.5,32.4 45,32.4 45,34.1
  pour cut-out: 41.5,36.35 41.5,34.65 45,34.65 45,36.35
  pour cut-out: 78.305,38.18 73.25,38.18 73.25,35.98
  pour cut-out: 78.595,35.98 73.25,35.98 73.25,37.85
  pour cut-out: 76.75,37.85 73.25,37.85 73.25,36.15 76.75,36.15
  pour cut-out: 58.5,40.935 58.5,38.25 57.4,38.25
  pour cut-out: 55.005,37.15 57.4,37.15 57.4,38.25
  pour cut-out: 53.76,40.935 53.76,38.25 54.86,38.25
  pour cut-out: 55.005,41.89 57.4,41.89 57.4,40.79
  pour cut-out: 78.45,48.68 76.085,48.68 76.085,49.865
  pour cut-out: 73.15,48.85 76.85,48.85 76.85,47.25
  pour cut-out: 76.85,47.25 73.15,47.25 73.15,48.85
  pour cut-out: 76.85,50.75 76.85,47.25 75.15,47.25 75.15,50.75
  pour cut-out: 80.845,48.68 78.45,48.68 78.45,49.78
  pour cut-out: 78.595,50.88 80.948,50.88 80.948,49.823
  pour cut-out: 58.5,61.11 58.5,58.5 57.8,58.5
  pour cut-out: 53.76,61.11 53.76,58.5 55.7,58.5
  pour cut-out: 60.5,59.35 57.505,59.35 57.505,57.65 60.5,57.65
  pour cut-out: 53,59.35 56.045,59.35 56.045,57.65 53,57.65
  pour cut-out: 58.5,63.505 58.5,61.11 57.4,61.11
  pour cut-out: 53.76,63.505 53.76,61.11 54.86,61.11
  pour cut-out: 55.005,64.75 57.4,64.75 57.4,63.65

## Silkscreen, mask and mechanical layers (free items; w line width, h text height)
Top Overlay:
  circle w0.2: c5.25,42.75 r1
  region: 1.25,32.25 3.97,32.25 3.97,30.86
  region: 1.25,39.5 3.97,39.5 3.97,41.02
  region: 77.193,53.528 77.193,48.448 82.273,48.448 82.273,53.528
  region: 46.72,59.89 11.147,59.89 11.147,62.43 46.72,62.43
  region: 6.25,51 9.5,51 9.75,51.25 9.75,55.75 9.5,56 7,56 6,55 6,51.25
  region: 92.72,62.52 91.5,63.74 91.5,64.75
  region: 92.72,62.52 91.49,63.75 90.5,63.75
  region: 26.497,44.5 26.5,44.5 29.25,44.5
  region: 3.446,6.547 3.446,4.03 13.619,4.03 13.619,6.57
  region: 3.97,25.27 2.74,26.5 1.75,26.5
  region: 3.97,25.27 2.75,26.49 2.75,27.5
  region: 1.25,15 3.97,15 3.97,12.57
  region: 1.25,22.5 3.97,22.5 3.97,25.27
  lines w0.2: 4.75,42.75 5.25,42.25 ; 5.25,44.75 5.25,42.25 ; 5.25,52 6,52 ; 5.25,53.125 6,53.125 ; 5.25,54.25 6,54.25 ; 5.75,42.75 5.25,42.25 ; 9.25,53 10.5,53 ; 9.5,52 10.5,52 ; 9.75,54.25 10.5,54.25 ; 18.497,57.054 18.497,36 ; 18.5,37.5 28.5,37.5 ; 18.5,39 28.5,39 ; 18.5,40.5 28.5,40.5 ; 18.5,42 28.5,42 ; 18.5,45 28.5,45 ; 18.5,46.5 28.5,46.5 ; 18.5,48 28.5,48 ; 18.5,49.5 28.5,49.5 ; 18.5,51 28.5,51 ; 18.5,52.5 28.5,52.5 ; 18.5,54 28.5,54 ; 20.497,34.554 20.497,57.054 ; 22.497,34.554 22.497,57.054 ; 24.497,34.554 24.497,57.054 ; 28.497,57.054 28.497,36 ; 30,58.5 30,36 28.497,34.554 ; 18.497,36 18.497,34.554 28.497,34.554 ; 18.497,36 28.5,36 28.497,36 ; 28.497,34.554 28.497,36
  lines w0.5: 18.497,55.554 28.497,55.554 30,57 ; 18.5,43.5 28.5,43.5 ; 28.497,43.5 30,45.25 ; 18.497,57.054 28.497,57.054 30,58.5 20.5,58.5 18.497,57.054
  text "TRUTH TABLE" at 20.863,57.3 h0.6
  text "PINOUT" at 4.727,56.37 h2
  text "S2" at 18.847,55.854 h0.6
  text "S1" at 20.947,55.854 h0.6
  text "S0" at 22.847,55.854 h0.6
  text "TR" at 25.847,55.854 h0.6
  text "0" at 18.85,54.3 h0.6
  text "0" at 20.95,54.3 h0.6
  text "0" at 22.85,54.3 h0.6
  text "TOVER" at 10.45,54.05 h0.6
  text "+45" at 25.25,53.76 h0.6
  text "S2" at 2.8,53.55 h0.6
  text "0" at 18.85,52.8 h0.6
  text "0" at 20.95,52.8 h0.6
  text "1" at 22.85,52.8 h0.6
  text "+55" at 25.55,52.8 h0.6
  text "S1" at 3.1,52.3 h0.6
  text "GND" at 9.95,52.3 h0.6
  text "0" at 18.85,51.3 h0.6
  text "0" at 20.95,51.3 h0.6
  text "Flt" at 22.7,51.3 h0.6
  text "+65" at 25.55,51.3 h0.6
  text "S0" at 3.1,51.05 h0.6
  text "VCC" at 10.55,51.05 h0.6
  text "B162" at 104.19,50.37 h2
  text "0" at 18.85,49.8 h0.6
  text "1" at 20.95,49.8 h0.6
  text "0" at 22.85,49.8 h0.6
  text "+75" at 25.55,49.8 h0.6
  text "0" at 18.85,48.3 h0.6
  text "1" at 20.95,48.3 h0.6
  text "1" at 22.85,48.3 h0.6
  text "+85" at 25.55,48.3 h0.6
  text "0" at 18.85,46.8 h0.6
  text "1" at 20.95,46.8 h0.6
  text "Flt" at 22.7,46.8 h0.6
  text "+95" at 25.55,46.8 h0.6
  text "0" at 18.85,45.3 h0.6
  text "Flt" at 20.7,45.3 h0.6
  text "0" at 22.85,45.3 h0.6
  text "+105" at 25.3,45.3 h0.6
  text "TOVER" at 30.9,44.935 h0.6 r90
  text "0" at 18.85,43.8 h0.6
  text "Flt" at 20.7,43.8 h0.6
  text "1" at 22.85,43.8 h0.6
  text "+115" at 25.35,43.8 h0.6
  text "1" at 18.85,42.3 h0.6
  text "Flt" at 20.7,42.3 h0.6
  text "0" at 22.85,42.3 h0.6
  text "+5" at 25.85,42.3 h0.6
  text "1" at 18.85,40.8 h0.6
  text "Flt" at 20.7,40.8 h0.6
  text "1" at 22.85,40.8 h0.6
  text "-5" at 25.85,40.8 h0.6
  text "VCC" at 7.05,39.3 h0.6
  text "1" at 18.85,39.3 h0.6
  text "Flt" at 20.7,39.3 h0.6
  text "Flt" at 22.7,39.3 h0.6
  text "-15" at 25.6,39.3 h0.6
  text "Flt" at 18.6,37.8 h0.6
  text "0" at 20.95,37.8 h0.6
  text "0" at 22.85,37.8 h0.6
  text "-25" at 25.55,37.8 h0.6
  text "SDA" at 7.05,36.717 h0.6
  text "Flt" at 18.1,36.3 h0.6
  text "0" at 20.95,36.3 h0.6
  text "1" at 22.85,36.3 h0.6
  text "-35" at 25.55,36.3 h0.6
  text "Flt" at 18.697,34.854 h0.6
  text "0" at 20.947,34.854 h0.6
  text "Flt" at 22.697,34.854 h0.6
  text "-45" at 25.547,34.854 h0.6
  text "SCL" at 7.05,34.133 h0.6
  text "READ" at 41.801,34.01 h0.6
  text "TUNDER" at 30.9,33.185 h0.6 r90
  text "DEBUG" at 3.908,32.25 h2 r90
  text "WRITE" at 42.226,32.114 h0.6
  text "GND" at 7.05,31.55 h0.6
  text "ERROR" at 42.226,29.864 h0.6
  text "RELE1" at 10.476,19.865 h2
  text "SENSOR" at 4.067,15 h2 r90
  text "M1-SPI-ATM64 (V2)" at 59.341,11.468 h3
  text "TOVER to VCC" at 14.435,7.008 h0.6
  text "S1" at 6.1,6.3 h0.6
  text "S2" at 8.6,6.3 h0.6
  text "TOVER" at 10.45,6.3 h0.6
  text "S0" at 1.434,5.6 h0.6
  text "ТО2429" at 70.876,5.046 h3
  text "ADT6401/ADT6402" at 59.403,1.345 h3
Bottom Overlay:
  text "SCL" at 94.7,63.05 h0.6
  text "SDA" at 97.45,63.05 h0.6
  text "S0" at 92.4,54.55 h0.6
  text "TOV" at 99.95,54.55 h0.6
  text "S1" at 92.4,53.55 h0.6
  text "S2" at 99.35,53.55 h0.6
  text "ТО2429" at 82.124,2.296 h3
Board:
  lines w0.2: 86.411,56.712 cw(c86.411,57.356) 85.767,57.356 85.767,57.454 ; 86.451,46.471 cw(c86.451,47.164) 85.758,47.164 ; 86.476,26.688 cw(c86.476,27.381) 85.783,27.381 ; 86.524,26.688 86.573,26.688 ccw(c86.573,27.381) 87.266,27.381 87.266,33.226 ; 85.758,17.365 ccw(c86.402,17.365) 86.402,16.721 86.5,16.721 ccw(c86.5,17.462) 87.242,17.462 ; 85.758,17.365 ccw(c85.758,17.365) 85.758,17.365 ; 85.758,17.365 85.758,23.307 cw(c86.451,23.307) 86.451,24 86.5,24 cw(c86.5,23.258) 87.242,23.258 87.242,17.462 ; 85.758,37.238 ccw(c86.5,37.238) 86.5,36.496 ; 85.758,37.238 ccw(c85.758,37.238) 85.758,37.238 ; 85.758,37.238 85.758,43.034 cw(c86.5,43.034) 86.5,43.775 ; 85.758,47.164 ccw(c85.758,47.164) 85.758,47.164 ; 85.758,47.164 85.758,53.008 cw(c86.5,53.008) 86.5,53.75 ; 85.767,57.454 ccw(c85.767,57.454) 85.767,57.454 ; 85.767,57.454 85.767,63.25 cw(c86.508,63.25) 86.508,63.992 cw(c86.508,63.25) 87.25,63.25 ; 85.783,27.381 ccw(c85.783,27.381) 85.783,27.381 ; 85.783,27.381 85.783,33.226 cw(c86.524,33.226) 86.524,33.967 cw(c86.524,33.226) 87.266,33.226 ; 86.5,36.496 ccw(c86.5,37.238) 87.242,37.238 87.242,43.034 ; 86.5,36.496 86.5,36.496 ; 86.5,43.775 cw(c86.5,43.034) 87.242,43.034 ; 86.5,43.775 86.5,43.775 ; 86.5,46.471 ccw(c86.5,47.212) 87.242,47.212 87.242,53.008 ; 86.5,46.471 86.5,46.471 ; 86.5,53.75 cw(c86.5,53.008) 87.242,53.008 ; 86.5,53.75 86.5,53.75 ; 86.508,56.712 ccw(c86.508,57.454) 87.25,57.454 87.25,63.25 ; 86.508,56.712 86.508,56.712 ; 87.242,13 ccw(c86.5,13) 86.5,13.742 ccw(c86.5,13) 85.758,13 85.758,3.402 ccw(c86.402,3.402) 86.402,2.758 86.549,2.758 ccw(c86.549,3.451) 87.242,3.451 87.242,13 ; 87.242,13 ccw(c87.242,13) 87.242,13 ; 87.242,17.462 ccw(c87.242,17.462) 87.242,17.462 ; 87.242,43.034 ccw(c87.242,43.034) 87.242,43.034 ; 87.242,53.008 ccw(c87.242,53.008) 87.242,53.008 ; 87.25,63.25 ccw(c87.25,63.25) 87.25,63.25 ; 87.266,33.226 ccw(c87.266,33.226) 87.266,33.226 ; 91.959,44.73 ccw(c91.959,44.73) 91.959,44.73 ; 91.959,44.73 ccw(c91.959,43.989) 91.217,43.989 91.217,43.891 ccw(c91.861,43.891) 91.861,43.247 97.755,43.247 ; 91.959,44.73 97.755,44.73 cw(c97.755,43.989) 98.496,43.989 ; 91.959,44.73 91.959,44.73 ; 97.755,43.247 ccw(c97.755,43.989) 98.496,43.989 ; 97.755,43.247 ccw(c97.755,43.247) 97.755,43.247 ; 98.496,43.989 98.496,43.989 ; 102.459,44.73 ccw(c102.459,44.73) 102.459,44.73 ; 102.459,44.73 ccw(c102.459,43.989) 101.717,43.989 101.717,43.94 ccw(c102.41,43.94) 102.41,43.247 109.5,43.247 ccw(c109.5,43.989) 110.242,43.989 ccw(c109.5,43.989) 109.5,44.73 102.459,44.73 ; 0,0 113,0 113,67 0,67 0,0

## Dimensions
113,67 to 113,0 on Mechanical 1
0,67 to 113,67 on Mechanical 1

## Text inside footprints (layer, text, board x,y; h text height)
D1: Top Overlay "SOT-23-6" at 103.301,52.76 h0.6
K1: Bottom Overlay "+" at 22.97,19.45 h0.6 r180; Bottom Overlay "-" at 22.82,14.14 h0.6 r180
VD1: Bottom Overlay "+" at 28.002,14.135 h0.6 r270